# Altium PCB Power_vac.PcbDoc (part 4 of 5)
Units mm, origin at the board's own origin, x right, y up, seen from the top; angles counter-clockwise.
Board outline 180 x 212 mm, 4 copper layers (Top Layer, Int1 (GND), Int2 (PWR), Bottom Layer), stack 2.01 mm thick; 296 components, 149 nets, 798 pads, 522 vias.
Unrouted connection lines stored in the file: 1.
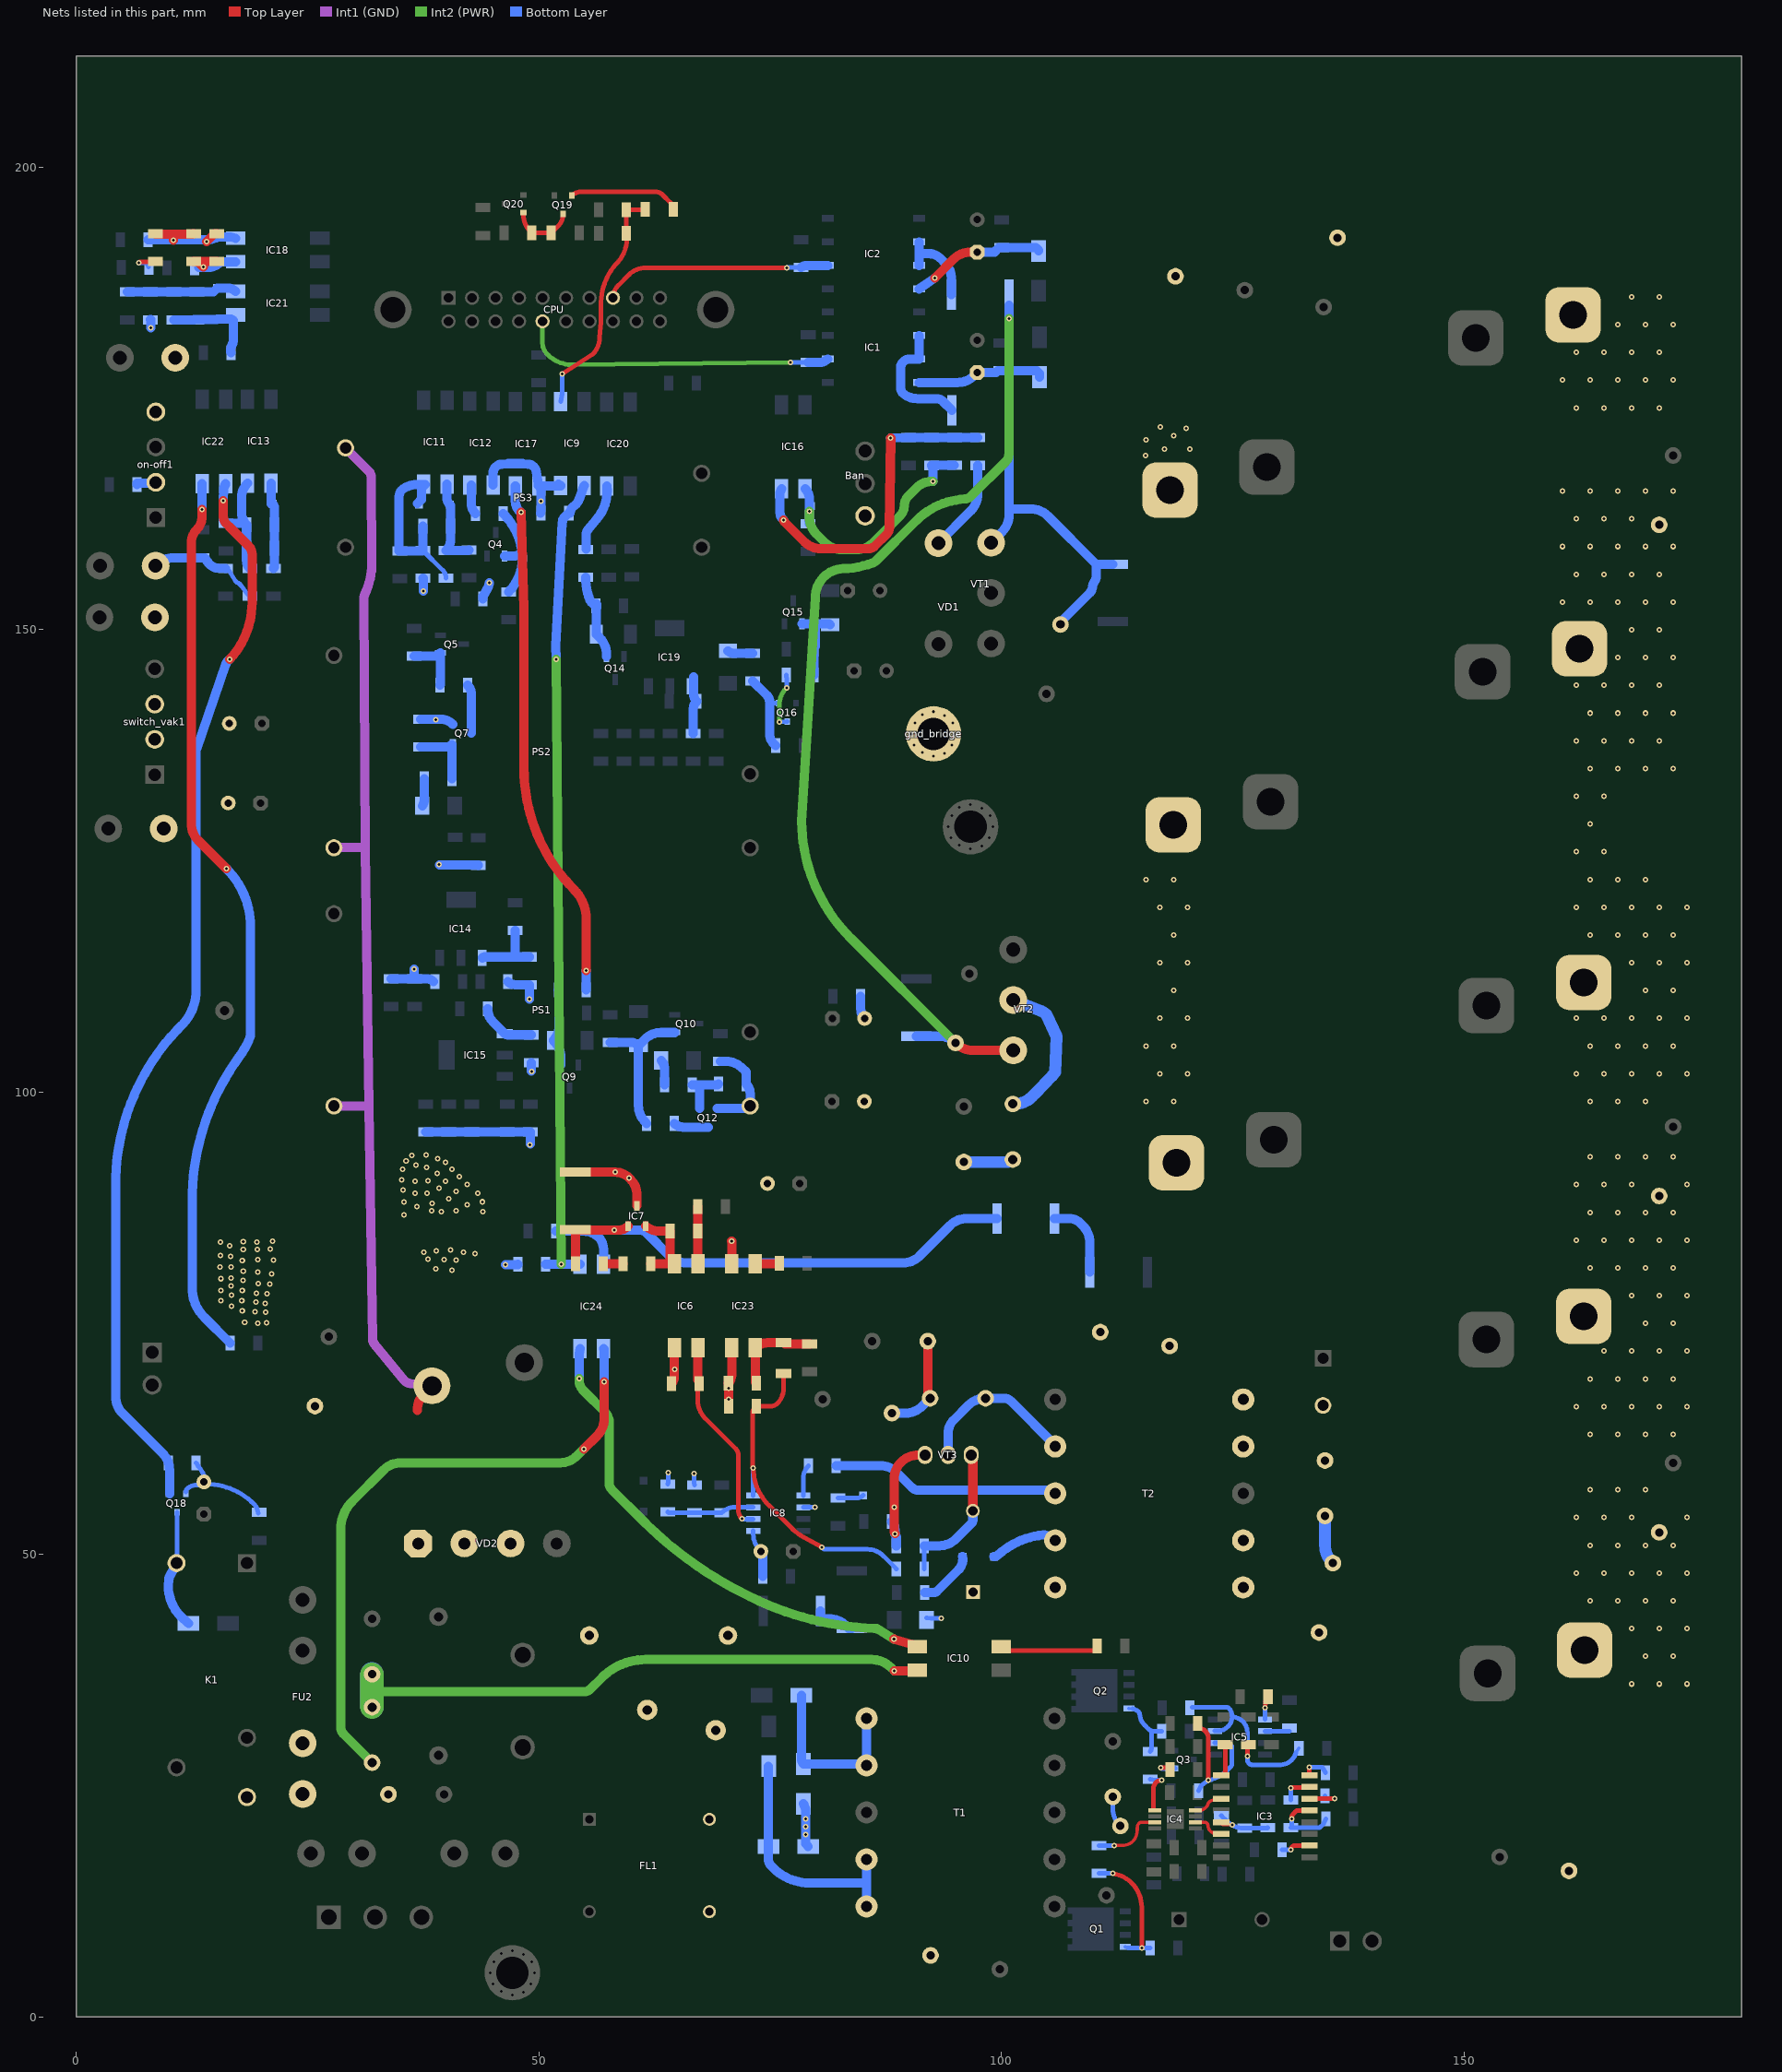
[diagram p5: the nets of this part, all layers, seen from the top]

## Via types
v1: diameter 0.6/0.6/0.6/0.6 (per signal layer), hole 0.3, Top Layer to Bottom Layer, tented both sides, 277 vias
v2: diameter 0.6, hole 0.3, Top Layer to Bottom Layer, tented both sides, 239 vias
v3: diameter 1.27, hole 0.711, Top Layer to Bottom Layer, 6 vias

## Nets (pads, with @x,y where several pads share a name; then routed paths per layer and width w, separated by ;. In a path a pad name is that pad's centre, name@x,y a point inside that pad or via, vN(x,y) a via of type N, cw(c..) or ccw(c..) an arc to the next point about the centre after c; other vN are vias at no path point) (continued)
GND_force: Ban.3 C1.2 C2.2 C3.2 C4.2 C5.2 C6.2 C7.2 C8.2 C9.2 C10.2 C11.2 C12.2 C13.2 C14.2 C15.1 C42.2 C52.1 C53.1 C54.2 C55.2 C56.1 C57.1 C58.1 C59.1 C60.1 C61.1 C62.1 C63.1 C64.1 C65.1 C66.1 C67.1 C68.2 C69.2 C79.1 C80.1 C81.1 C82.2 C83.1 C84.2 C90.2 C91.1 C93.1 C95.1 C97.1 C99.1 C101.1 D17.1 D22.1 D23.1 D24.1 gnd_bridge.1 IC7.3 IC9.2 IC12.3 IC17.3 IC23.2 on-off1.2 on-off1.4 PS1.3 Q7.2 Q12.2 Q18.2 R41.1 R54.1 R57.1 R61.1 R71.1 R87.1 R98.2 switch_vak1.2 switch_vak1.3 T2.6 T2.7 VD1.1 | length 117.7
  Top Layer w0.5: v2(6.75,189.675) cw(c6.931,189.494) 6.931,189.75 C97.1@8.525,189.75
  Top Layer w1: R41.1@53.925,91.325 v2(58.241,91.325) cw(c58.241,89.191) v2(59.75,90.7) 59.856,90.594 cw(c58.06,88.798) 60.6,88.798 IC7.3@60.6,87.7 ; v2(70.825,83.85) 70.83,83.845 IC23.2@70.83,81.425 ; gnd_bridge.1@92.65,138.725 gnd_bridge.1@92.947,138.428 ; C7.2@117.075,129.554 C7.2@118.575,128.875
  Bottom Layer w0.5: v2(6.75,189.675) 7.575,189.675 C79.1@7.8,189.225 ; Q18.2@11.825,56.752 cw(c12.325,56.75) 12.029,57.153 cw(c13.057,55.747) 13.057,57.489 13.72,57.489 ccw(c13.72,57.989) 13.927,57.534 13.95,57.489 ccw(c10.963,57.488) 13.175,59.495 R87.1@12.925,59.9 ; C84.2@13.775,57.825 14.011,57.589 cw(c14.011,50.286) 19.169,55.456 cw(c18.089,54.364) 19.569,54.775 C83.1@19.624,54.429 ; C81.1@16.1,156.6 16.507,156.35 17.149,155.291 17.15,155.289 ccw(c17.577,155.55) 17.364,155.097 cw(c16.9,154.1) 17.788,154.749 18.444,153.852 C91.1@18.744,153.602
  Bottom Layer w1: C80.1@6.525,165.7 6.525,165.812 8.462,165.812 on-off1.2@8.575,165.925 ; C99.1@8,183.525 8.05,183.525 v2(8.05,182.625) ; D17.1@8.55,156.9 8.681,157.031 cw(c10.477,155.235) 10.477,157.775 C82.2@13.575,157.775 13.873,157.775 13.875,157.775 14.152,157.373 cw(c13.328,156.806) 14.189,157.315 ccw(c15.352,158) 15.267,156.653 C81.1@16.1,156.6 ; C60.1@34.025,112.25 C59.1@36.525,112.25 ; v2@36.475,113.299 cw(c35.476,113.25) 36.476,113.25 36.476,112.25 C59.1@36.525,112.25 ; R54.1@37.175,140.3 39.372,140.3 cw(c39.372,138.422) Q7.2@40.7,139.75 ; C95.1@37.45,155.547 37.5,155.547 v2(37.5,154.175) ; C63.1@37.75,95.675 C64.1@40.25,95.675 C65.1@42.751,95.675 C66.1@46.55,95.675 C67.1@49.05,95.675 v2@49.05,94.361 ; C58.1@38.6,111.925 ccw(c37.815,111.14) 37.815,112.25 C59.1@36.525,112.25 ; v2@39.235,124.55 C53.1@40.95,124.55 43.329,124.55 cw(c43.329,124.379) C56.1@43.45,124.5 ; C52.1@43.95,153.3 43.95,153.6 44.423,154.431 ccw(c43.25,155.099) 44.566,154.797 44.584,154.877 cw(c45.9,154.575) v2(44.637,155.052) ; IC12.3@45.035,165.625 45.035,166.175 45.035,166.9 cw(c46.035,166.9) 45.961,167.897 46.615,167.946 cw(c46.716,166.6) 46.716,167.95 48.166,167.95 cw(c48.166,166.6) 48.289,167.944 48.819,167.896 cw(c48.728,166.9) 49.717,167.046 49.857,166.1 IC17.3@49.936,165.567 ; v2(46.375,81.3) 47.604,81.3 ccw(c47.604,81.471) C15.1@47.725,81.35 ; C57.1@46.626,111.925 ccw(c47.41,112.71) 47.41,111.6 R57.1@48.95,111.6 v2(48.95,110.05) ; v2@49.175,102.26 R61.1@49.175,103.175 ; IC17.3@49.981,165.55 cw(c49.39,164.96) 50.225,164.96 v2(50.225,163.9) 50.225,162.9 50.18,162.607 R98.2@50.175,162.577 ; IC17.3@50.156,165.55 IC9.2@52.345,165.55 ; IC9.2@52.116,165.742 IC9.2@52.341,165.575 ; Q12.2@69.25,98.2 72.161,98.2 ccw(c72.161,99.139) PS1.3@72.825,98.475 72.825,99.824 ccw(c71.374,99.824) R71.1@72.4,100.85 72.4,102.115 ccw(c72.315,102.115) 72.375,102.175 71.994,102.556 ccw(c70.198,100.76) 70.198,103.3 C62.1@69.6,103.3 ; C61.1@84.775,110.325 84.775,108.976 ccw(c86.226,108.976) C68.2@85.2,107.95 ; VD1.1@93.175,159.35 96.681,162.856 ccw(c94.885,164.652) 97.425,164.652 C101.1@97.425,167.75
  other v1: 168.125,35.975 171.125,35.975 174.125,35.975 169.625,38.975 172.625,38.975 168.125,41.975 171.125,41.975 174.125,41.975 163.625,44.975 166.625,44.975 169.625,44.975 172.625,44.975 162.125,47.975 165.125,47.975 168.125,47.975 171.125,47.975 174.125,47.975 163.625,50.975 166.625,50.975 169.625,50.975 172.625,50.975 162.125,53.975 165.125,53.975 168.125,53.975 174.125,53.975 163.625,56.975 166.625,56.975 169.625,56.975 163.625,62.975 166.625,62.975 169.625,62.975 172.625,62.975 162.125,65.975 165.125,65.975 168.125,65.975 171.125,65.975 174.125,65.975 163.625,68.975 166.625,68.975 169.625,68.975 172.625,68.975 165.125,71.975 168.125,71.975 171.125,71.975 174.125,71.975 169.625,74.975 172.625,74.975 168.125,77.975 171.125,77.975 174.125,77.975 163.625,80.975 166.625,80.975 169.625,80.975 172.625,80.975 162.125,83.975 165.125,83.975 168.125,83.975 171.125,83.975 174.125,83.975 163.625,86.975 166.625,86.975 169.625,86.975 172.625,86.975 162.125,89.975 165.125,89.975 168.125,89.975 174.125,89.975 163.625,92.975 166.625,92.975 169.625,92.975 172.625,92.975 115.625,98.975 118.625,98.975 163.625,98.975 166.625,98.975 169.625,98.975 117.125,101.975 120.125,101.975 162.125,101.975 165.125,101.975 168.125,101.975 171.125,101.975 174.125,101.975 115.625,104.975 118.625,104.975 163.625,104.975 166.625,104.975 169.625,104.975 172.625,104.975 117.125,107.975 120.125,107.975 162.125,107.975 165.125,107.975 168.125,107.975 171.125,107.975 174.125,107.975 118.625,110.975 169.625,110.975 172.625,110.975 117.125,113.975 120.125,113.975 168.125,113.975 171.125,113.975 174.125,113.975 118.625,116.975 163.625,116.975 166.625,116.975 169.625,116.975 172.625,116.975 117.125,119.975 120.125,119.975 162.125,119.975 165.125,119.975 168.125,119.975 171.125,119.975 174.125,119.975 115.625,122.975 118.625,122.975 163.625,122.975 166.625,122.975 169.625,122.975 162.125,125.975 165.125,125.975 163.625,128.975 162.125,131.975 165.125,131.975 163.625,134.975 166.625,134.975 169.625,134.975 172.625,134.975 162.125,137.975 165.125,137.975 168.125,137.975 171.125,137.975 163.625,140.975 166.625,140.975 169.625,140.975 172.625,140.975 162.125,143.975 165.125,143.975 168.125,143.975 171.125,143.975 166.625,146.975 169.625,146.975 172.625,146.975 168.125,149.975 171.125,149.975 160.625,152.975 163.625,152.975 166.625,152.975 169.625,152.975 172.625,152.975 162.125,155.975 165.125,155.975 168.125,155.975 171.125,155.975 160.625,158.975 163.625,158.975 166.625,158.975 169.625,158.975 172.625,158.975 162.125,161.975 165.125,161.975 168.125,161.975 160.625,164.975 163.625,164.975 166.625,164.975 169.625,164.975 172.625,164.975 118.625,170.975 162.125,173.975 165.125,173.975 168.125,173.975 171.125,173.975 160.625,176.975 163.625,176.975 166.625,176.975 169.625,176.975 172.625,176.975 162.125,179.975 165.125,179.975 168.125,179.975 171.125,179.975 166.625,182.975 169.625,182.975 172.625,182.975 168.125,185.975 171.125,185.975
  other v2: 19.575,75 20.55,75.025 18.175,75.075 20.45,76.175 19.3,76.25 17.925,76.325 16.775,76.85 20.4,77.15 19.375,77.275 15.625,77.425 17.875,77.425 16.775,78.05 20.6,78.2 19.45,78.25 15.625,78.525 17.925,78.525 16.7,79.025 20.9,79.225 19.625,79.275 18,79.625 15.625,79.8 16.725,79.875 21.1,80.325 19.575,80.5 18.025,80.625 40.6,80.7 38.825,80.85 15.525,81.075 16.7,81.075 17.925,81.775 21.3,81.8 41.05,81.8 19.6,81.85 39.725,81.85 38,81.9 16.65,82.225 15.575,82.325 43.075,82.5 37.55,82.675 41.85,82.675 38.875,82.8 40.425,82.925 18.025,82.975 19.525,82.975 20.925,83 16.575,83.35 15.55,83.75 19.475,83.775 18.025,83.825 21.175,83.85 35.4,86.7 39.425,87.056 43.925,87.075 38.381,87.147 41.049,87.15 36.775,87.625 42.25,87.825 38.45,87.975 35.4,88.1 43.875,88.125 40.25,88.45 36.575,89.025 37.875,89.025 43.4,89.025 41.025,89.25 35.325,89.375 39.2,89.575 42.25,89.975 36.6,90.35 39.9,90.35 37.975,90.375 35.175,90.5 41.4,90.85 39,91.175 40.575,91.625 35.275,91.65 37.825,91.825 36.696,92.079 39.875,92.4 35.625,92.525 39.05,92.8 36.25,93.15 37.8,93.175 49.025,94.3 49.2,102.2 36.475,113.3 39.175,124.575 38.825,140.275 115.55,168.8 117.625,169.5 120.375,169.5 115.625,170.525 119.975,171.775 117.175,171.9
GND_N: C43.2 C44.2 C46.1 C47.2 C50.2 C51.2 C88.2 C89.2 C90.1 C92.2 D6.2 D7.2 IC6.3 IC8.1 IC8.6 IC23.3 PS1.2 PS2.2 PS3.2 R40.1 R42.1 T2.5 VD2.1 Z1.2 | length 144.2
  Top Layer w0.5: IC6.3@64.155,72.8 IC6.3@64.63,72.325 ; IC23.3@70.355,72.65 IC23.3@70.83,72.325
  Top Layer w1: 36.825,65.573 cw(c39.365,65.573) 37.569,67.369 C50.2@38.425,68.225 ccw(c37.339,67.139) C50.2@37.339,68.675 ; C44.2@64.325,68.475 ccw(c63.589,69.211) 64.63,69.211 IC6.3@64.63,72.325 ; C89.2@70.5,66 70.5,68.44 ccw(c70.415,68.44) C88.2@70.475,68.5 ccw(c69.618,69.357) 70.83,69.357 IC23.3@70.83,72.325
  Int1 (GND) w1: PS1.2@27.825,98.475 31.327,98.475 cw(c31.327,98.065) 31.617,98.355 ; PS2.2@27.825,126.4 cw(c27.894,126.331) 27.894,126.429 31.2,126.429 31.05,153.363 31.05,153.365 cw(c32.05,153.368) 31.143,153.79 ccw(c23.158,157.524) 31.745,155.529 ; PS3.2@29.075,169.65 31.586,167.137 31.587,167.136 cw(c30.879,166.43) 31.879,166.436 31.93,157.19 31.93,157.187 cw(c24.782,157.147) 31.745,155.529 ; 31.198,126.139 31.615,98.479 31.617,98.355 ; C50.2@38.425,68.225 36.079,68.457 cw(c36.18,69.452) 35.408,68.816 32.22,72.704 cw(c32.994,73.337) 31.994,73.319 31.994,73.322 31.617,98.355
  Bottom Layer w0.5: C47.2@63.9,57.575 63.95,57.825 v2(63.95,58.85) ; v2(66.775,58.725) 66.775,57.75 R40.1@66.8,57.5 ; IC8.1@73.163,52.545 73.163,52.189 ccw(c75.703,52.189) 73.907,50.393 C43.2@73.975,50.325 ; IC8.6@78.587,55.085 v2(79.814,55.085) ccw(c79.814,55.136) v2@79.85,55.1 ; Z1.2@91.875,43.125 91.921,43.121 92.41,43.075 v2(93.475,43.075)
  Bottom Layer w1: C46.1@74.175,47.625 C43.2@74.175,49.842 ; D7.2@78.6,23.025 78.85,22.35 v2(78.85,21.375) v2(78.85,20.525) v2(78.85,19.675) 78.85,18.7 D6.2@79.1,18.4
  other v2: 70.525,66.775 70.525,67.95 64.675,70
NetC15_2: C15.2 IC9.1 IC24.3 R98.1 | length 88.7
  Int2 (PWR) w1: v2(51.85,146.8) v2(52.425,81.35)
  Bottom Layer w1: C15.2@50.725,81.35 v2(52.425,81.35) 54.205,81.35 IC24.3@54.43,81.35 ; v2(51.85,146.8) 51.825,148.233 cw(c52.825,148.25) 51.826,148.299 52.509,161.56 cw(c53.507,161.508) 52.837,162.25 R98.1@53.225,162.6 ; R98.1@53.352,162.6 53.352,162.603 cw(c54.35,162.549) 53.741,163.342 53.888,163.454 ccw(c53.066,164.525) 54.346,164.098 54.656,165.025 IC9.1@54.881,165.575
NetC17_1: C17.1 C18.2 D2.1 IC1.8 | length 13.9
  Bottom Layer w1: IC1.8@91.1,176.715 95.238,176.715 ccw(c95.238,179.255) 97.034,177.459 C17.1@97.375,177.8 99.4,177.8 99.6,178 103.4,178 103.425,177.975 103.8,177.975 104.1,177.675 D2.1@104.1,177.3
NetC19_2: C19.2 R1.1 R3.2 VT1.1 | length 35.5
  Bottom Layer w1: VT1.1@98.875,159.4 100.081,160.606 ccw(c98.285,162.402) 100.825,162.402 100.825,163.05 ; R1.1@100.825,172.7 100.825,163.05 ; C19.2@106.375,150.55 cw(c107.359,150.369) 106.651,151.076 109.534,153.959 ccw(c108.829,154.668) 109.823,154.564 cw(c111.22,154.421) 110.057,155.208 ccw(c109.227,155.765) 110.227,155.763 110.227,157.05 ; R3.2@112.05,157.05 110.227,157.05 ; 100.825,163.05 103.175,163.05 cw(c103.175,160.51) 104.97,162.307 cw(c103.175,160.51) 104.971,162.306 110.227,157.05
NetC20_1: C20.1 C21.2 D4.1 IC2.8 | length 14.7
  Top Layer w1: v2(92.775,188.025) 94.831,190.081 cw(c96.627,188.285) 96.627,190.825 C20.1@97.375,190.825
  Bottom Layer w1: IC2.8@91.1,186.84 v2(92.775,188.025) ; C20.1@97.375,190.825 99.25,190.825 99.725,191.3 C21.2@100.025,191.3 103.725,191.3 104.025,191 D4.1@104.025,190.95
NetC22_2: C22.2 R5.1 R7.2 VT2.1 | length 108.8
  Top Layer w1: C22.2@95.025,105.3 95.081,105.244 ccw(c96.877,107.04) 96.877,104.5 VT2.1@101.275,104.5
  Int2 (PWR) w1: 83.69,116.635 cw(c96.497,129.447) 78.383,129.189 cw(c96.497,129.447) 78.383,129.192 cw(c79.383,129.203) 78.383,129.203 cw(c79.383,129.203) 78.385,129.263 79.886,153.408 79.886,153.411 ccw(c78.888,153.47) 79.888,153.484 cw(c82.942,153.531) 82.847,156.585 ccw(c82.549,166.845) 82.849,156.585 ccw(c82.549,166.845) 86.075,157.205 ccw(c85.729,158.143) 86.329,157.343 ccw(c85.729,158.143) 86.434,157.434 90.781,161.781 cw(c96.455,156.091) 96.03,164.116 ccw(c95.975,165.114) 96.68,164.405 100.48,168.205 ccw(c99.709,168.977) 100.484,168.209 ccw(c99.709,168.977) 100.8,168.977 v2(100.8,183.65) ; 83.69,116.635 C22.2@95.025,105.3
  Bottom Layer w1: R7.2@90.8,106.025 93.275,106.025 cw(c93.275,103.55) C22.2@95.025,105.3 ; v2(100.8,183.65) R5.1@100.8,185.075
NetC28_2: C28.2 IC3.5 R15.2 | length 7.7
  Top Layer w0.5: v2(131.4,21.375) 131.389,21.533 cw(c131.888,21.565) 131.561,21.942 ccw(c131.067,22.517) 131.695,22.093 cw(c132.107,21.81) 132.106,22.31 IC3.5@133.3,22.31
  Bottom Layer w0.5: v2(131.4,21.375) 131.4,20.522 R15.2@131.301,20.423 133.605,20.423 ccw(c133.603,20.923) 133.618,20.423 133.68,20.425 cw(c133.694,19.925) 133.693,20.425 134.193,20.425 ccw(c134.193,20.925) 134.546,20.571 134.8,20.825 C28.2@135.05,21.375
NetC32_1: C32.1 IC3.8 | length 3.4
  Top Layer w0.5: v2(133.275,26.975) 133.275,26.27 IC3.8@133.3,26.12
  Bottom Layer w0.5: v2(133.275,26.975) 134.54,26.975 cw(c134.539,26.567) 134.574,26.973 cw(c134.543,26.625) 134.652,26.957 134.7,26.942 C32.1@135.025,26.376 C32.1@134.775,26.752
NetC33_1: C33.1 IC3.9 | length 3.5
  Top Layer w0.5: IC3.9@123.75,26.12 ccw(c123.75,26.545) 124.175,26.545 C33.1@124.175,29.425
NetC34_1: C34.1 C35.1 IC3.13 R14.1 | length 6.8
  Top Layer w0.35: IC3.13@123.75,21.04 ccw(c124.04,21.04) 124.04,20.75 v2(124.925,20.75)
  Bottom Layer w0.5: R14.1@123.775,21.725 124.356,21.144 ccw(c126.152,22.94) 126.152,20.4 C34.1@126.3,20.4 128.68,20.4 ccw(c128.68,20.571) C35.1@128.8,20.45
NetC38_1: C38.1 IC5.2 R21.2 | length 15.3
  Top Layer w0.5: C38.1@121.2,31.726 121.45,31.201 cw(c121.241,30.112) 122.35,30.112 v2(122.35,25.6)
  Bottom Layer w0.5: R21.2@121.325,24.45 121.575,25 v2(122.35,25.6) ; v2@122.362,25.548 ccw(c121.349,29.85) 124.478,26.728 124.754,27.004 ccw(c124.4,27.357) 124.9,27.357 124.9,29.086 ccw(c124.4,29.084) 124.607,29.539 cw(c124.996,30.395) 124.563,29.56 ccw(c124.335,29.115) 124.337,29.615 123.576,29.615 IC5.2@123.063,29.615
NetC39_1: C39.1 IC5.3 R20.1 R23.2 | length 21.3
  Top Layer w0.35: R23.2@126.575,29.1 R23.2@126.675,29.425
  Top Layer w0.5: v2(126.575,28.175) R23.2@126.575,29.1
  Bottom Layer w0.35: 129.942,27.225 cw(c129.942,26.875) 129.963,27.224 ; C39.1@131.825,28.548 C39.1@132.15,29.028
  Bottom Layer w0.5: R20.1@120.614,33.475 124.248,33.475 cw(c124.248,32.975) 124.661,33.257 cw(c123.4,32.4) 124.925,32.4 ; IC5.3@123.067,30.907 123.576,30.905 ccw(c123.327,32.468) 124.438,31.341 cw(c124.787,30.983) 124.455,31.356 ccw(c123.532,32.4) 124.925,32.4 ; 129.942,27.225 127.15,27.225 cw(c127.15,27.8) 126.575,27.8 v2(126.575,28.175) 126.575,30.75 ccw(c124.925,30.75) 124.925,32.4 ; 129.963,27.224 ccw(c130.076,29.037) C39.1@131.825,28.548
NetC40_2: C40.2 R25.2 | length 3.4
  Bottom Layer w0.5: R25.2@112.025,23.775 112.025,22.507 ccw(c114.565,22.507) 112.769,20.711 C40.2@112.852,20.628
NetC41_2: C41.2 D10.2 R26.1 | length 10.9
  Top Layer w1: R26.1@92.025,73.05 92.025,67.479 ccw(c92.879,67.479) D10.2@92.275,66.875
  Bottom Layer w1: C41.2@88.15,65.275 89.623,65.275 ccw(c89.623,67.815) 91.419,66.019 D10.2@92.275,66.875
NetC44_1: C44.1 IC6.4 IC8.2 | length 21.5
  Top Layer w0.5: C44.1@67.17,68.849 67.17,66.615 ccw(c69.841,66.611) 67.932,64.743 71.232,61.443 cw(c70.464,60.675) 71.233,61.441 cw(c70.464,60.675) 71.55,60.675 71.55,54.791 ccw(c72.916,54.791) v2(71.95,53.825)
  Top Layer w1: C44.1@67.17,68.849 IC6.4@67.17,72.325
  Bottom Layer w0.5: v2@71.95,53.815 v2@71.974,53.815 ; v2(71.95,53.825) ccw(c71.974,53.849) v2@71.974,53.815 ; IC8.2@73.163,53.815 v2@71.974,53.815
NetC45_1: C45.1 IC7.1 R36.1 R41.2 | length 54
  Top Layer w1: C45.1@53.95,81.4 53.95,85.065 58.599,85.065 ccw(c58.599,86.551) IC7.1@59.65,85.5
  Bottom Layer w1: v2(58.124,85.075) 60.886,85.075 cw(c60.886,84.075) 61.593,84.782 64.131,82.244 ccw(c65.927,84.04) 65.927,81.5 89.323,81.5 ccw(c89.323,84.04) 91.119,82.244 94.456,85.581 cw(c96.252,83.785) 96.252,86.325 R36.1@99.525,86.325
NetC45_2: C45.2 R34.1 | length 2.1
  Top Layer w1: C45.2@56.95,81.4 R34.1@59.075,81.4
NetC47_1: C47.1 IC8.3 R37.2 R40.2 | length 9.4
  Bottom Layer w0.5: C47.1@63.9,54.575 ccw(c64.081,54.756) 64.081,54.5 R40.2@66.8,54.5 R37.2@69.75,54.5 cw(c71.162,53.088) 71.162,55.085 IC8.3@73.163,55.085
NetC49_1: C49.1 FL1.4 R46.1
NetC49_2: C49.2 FL1.3 VD2.4
NetC86_1: C86.1 C91.2 D19.2 IC13.2 R59.2 R60.1 | length 11.9
  Bottom Layer w1: R59.2@16.152,161.5 17.973,161.5 cw(c17.973,160.931) R60.1@18.375,161.333 ; IC13.2@18.48,165.825 ccw(c20.001,164.304) 17.85,164.304 D19.2@17.85,163.625 17.85,162.601 ccw(c19.642,162.601) R60.1@18.375,161.333 ; C91.2@18.744,156.602 cw(c19.634,157.492) 18.375,157.492 C86.1@18.375,158.802 R60.1@18.375,161.333
NetC86_2: C86.2 D19.1 IC13.1 R56.1 R60.2 | length 9.3
  Bottom Layer w1: D19.1@21.02,163.572 IC13.1@21.02,165.825 ; D19.1@21.2,163.625 cw(c20.778,163.203) 21.375,163.203 R60.2@21.375,161.333 C86.2@21.375,158.802 21.375,156.825 cw(c21.059,156.825) R56.1@21.282,156.602
NetC87_2: C87.2 IC9.3 R88.2 R92.2 | length 25.5
  Top Layer w0.5: v2(52.5,177.65) 55.753,179.745 ccw(c55.483,180.165) 55.837,179.813 55.84,179.816 ccw(c54.01,181.577) 55.843,179.819 ccw(c54.01,181.577) 56.55,181.577 cw(c57.05,181.577) 56.551,181.614 56.671,183.243 ccw(c55.46,183.335) 56.675,183.335 56.675,185.047 56.675,185.049 cw(c63.756,185.051) 57.219,187.774 cw(c62.969,185.379) 58.571,189.789 ccw(c58.217,190.142) 58.595,189.815 ccw(c55.835,192.187) 58.596,189.816 ccw(c55.835,192.187) C87.2@59.415,192.844 ; C87.2@59.45,192.85 R88.2@59.45,195.4 61.379,195.4 ccw(c61.379,195.571) R92.2@61.5,195.45
  Bottom Layer w0.5: IC9.3@52.341,174.675 52.5,175.475 v2(52.5,177.65)
NetC88_1: C88.1 D15.2 IC23.4 R90.1 | length 9.9
  Top Layer w1: C88.1@73.475,68.5 cw(c73.728,68.754) 73.37,68.754 IC23.4@73.37,72.325 cw(c74.698,70.997) 74.698,72.875 D15.2@76.425,72.875 ccw(c76.727,73.177) 76.727,72.75 R90.1@79.25,72.75
NetC89_1: C89.1 D15.1 IC8.4 R91.1 | length 36.3
  Top Layer w0.5: D15.1@76.425,69.575 76.425,67.894 cw(c74.206,67.894) 75.775,66.325 cw(c74.99,67.11) 74.99,66 C89.1@73.5,66 73.246,65.746 ccw(c73.6,65.393) 73.1,65.393 73.1,59.602 cw(c72.6,59.605) 73.1,59.589 ccw(c73.599,59.572) 73.137,59.382 v2(73.163,59.319) ccw(c78.792,59.319) 74.812,55.338 77.383,52.767 77.385,52.765 ccw(c81.28,56.682) 78.638,51.831 v2(80.575,50.775)
  Bottom Layer w0.5: IC8.4@73.163,56.355 v2(73.163,59.319) ; v2(80.575,50.775) 80.594,50.749 ccw(c80.998,51.044) 80.996,50.544 85.501,50.544 cw(c85.498,48.11) 87.219,49.831 R91.1@88.625,48.425
NetC93_2: C93.2 R96.1 | length 5.3
  Bottom Layer w1.27: R96.1@134.975,54.15 134.975,50.952 ccw(c137.515,50.952) 135.719,49.156 C93.2@135.825,49.05
NetC94_1: C94.1 C95.2 D20.2 IC11.2 R53.1 R55.2 | length 20.8
  Bottom Layer w0.5: C95.2@37.45,158.547 39.615,156.382 cw(c38.806,155.573) C94.1@39.95,155.573
  Bottom Layer w1: R55.2@34.875,158.496 34.875,164.398 cw(c35.875,164.395) 35.333,165.235 cw(c36.827,162.914) 36.827,165.675 37.68,165.675 37.28,165.275 37.28,164.055 D20.2@36.85,163.625 ; R55.2@34.95,158.496 37.328,158.496 ccw(c37.328,158.669) C95.2@37.45,158.547 R53.1@37.45,161.2
NetC94_2: C94.2 D20.1 IC11.1 R48.1 R53.2 | length 9.9
  Bottom Layer w1: IC11.1@40.045,165.725 40.045,164.236 ccw(c41.086,164.236) D20.1@40.35,163.5 cw(c40.109,163.259) 40.45,163.259 R53.2@40.45,161.2 40.45,159.78 cw(c38.743,159.78) C94.2@39.95,158.573 42.389,158.573 ccw(c42.389,158.66) R48.1@42.45,158.599
NetC96_1: C96.1 C97.2 D16.2 IC18.2 R75.1 R76.2 | length 15.8
  Top Layer w1: C97.2@8.525,192.75 10.497,192.75 ; v2(10.45,192.1) 10.45,192.637 cw(c10.61,192.637) 10.497,192.75 ; C96.1@12.65,192.825 cw(c12.469,193.006) 12.469,192.75 10.497,192.75 ; v2(14.05,191.95) 14.766,192.666 cw(c15.15,192.282) R75.1@15.15,192.825
  Bottom Layer w1: R76.2@7.75,192.175 14.361,192.175 ccw(c14.361,193.175) 14.711,192.238 15.091,192.381 cw(c15.441,191.444) 15.441,192.444 16.65,192.444 IC18.2@17.2,192.32
NetC96_2: C96.2 D16.1 IC18.1 R72.1 R75.2 | length 7.9
  Top Layer w1: v2(13.7,189.2) 13.376,189.524 ccw(c12.65,188.799) C96.2@12.65,189.825 R75.2@15.15,189.825
  Bottom Layer w1: R72.1@13.2,189.175 13.7,189.175 14.28,189.175 ccw(c14.28,190.786) 15.308,189.545 cw(c15.943,188.773) 15.941,189.773 IC18.1@17.193,189.773
NetC98_1: C98.1 C99.2 D18.2 IC21.2 R84.1 R85.2 | length 12
  Bottom Layer w0.5: R85.2@5.475,186.5 R85.2@5.487,186.512 ; C99.2@7.987,186.512 8,186.525 C99.2@8.012,186.512 ; C98.1@10.487,186.512 C98.1@10.5,186.5 C98.1@10.505,186.505
  Bottom Layer w1: R85.2@5.487,186.512 C99.2@7.987,186.512 ; C99.2@8.012,186.512 C98.1@10.487,186.512 ; C98.1@10.505,186.505 R84.1@13.02,186.505 ; R84.1@13.025,186.511 14.786,186.511 D18.2@15.2,186.925 16.343,186.925 cw(c16.343,185.713) IC21.2@17.2,186.57
NetC98_2: C98.2 D18.1 IC21.1 R82.1 R84.2 | length 10.1
  Bottom Layer w1: C98.2@10.5,183.5 12.714,183.5 12.725,183.511 13.025,183.511 15.136,183.511 D18.1@15.2,183.575 16.602,183.575 cw(c16.602,183.08) 16.952,183.43 ccw(c17.95,183.369) 16.95,183.371 16.95,181.375 cw(c15.498,181.375) 16.776,180.686 ccw(c17.657,180.214) R82.1@16.7,179.925
NetC100_1: C100.1 C101.2 D21.2 IC16.2 R64.2 R67.1 | length 36.4
  Top Layer w1: v2(76.45,161.85) ccw(c76.752,161.85) 76.538,161.637 78.681,159.494 ccw(c80.477,161.29) 80.477,158.75 85.611,158.75 ccw(c85.611,159.75) 86.211,158.95 ccw(c85.611,159.75) 86.317,159.042 87.582,160.307 ccw(c86.875,161.015) 87.875,160.999 v2(88.025,170.7)
  Bottom Layer w1: IC16.2@76.23,165.225 76.025,164.675 D21.2@76.025,163.375 76.046,162.634 ccw(c77.045,162.663) 76.358,161.937 v2(76.45,161.85) ; v2(88.025,170.7) 89.625,170.75 R64.2@89.925,170.75 ; R64.2@89.901,170.75 R67.1@92.425,170.75 92.43,170.755 C100.1@94.925,170.755 97.12,170.755 97.125,170.75 C101.2@97.425,170.75
NetC100_2: C100.2 D21.1 IC16.1 R63.1 R67.2 | length 27.4
  Int2 (PWR) w1: v2(79.225,162.775) 79.225,162.152 ccw(c81.765,162.152) 79.969,160.356 80.931,159.394 ccw(c82.727,161.19) 82.727,158.65 84.323,158.65 ccw(c84.323,161.19) 86.119,159.394 89.051,162.326 ccw(c88.026,163.35) 89.475,163.35 cw(c91.044,163.35) 89.935,164.46 90.781,165.306 cw(c92.577,163.51) v2(92.577,166.05)
  Bottom Layer w1: IC16.1@78.77,165.225 cw(c77.672,164.127) 79.225,164.127 v2(79.225,162.775) R63.1@79.225,161.45 ; R67.2@92.425,167.75 cw(c91.577,167.219) 92.577,167.222 v2(92.577,166.05) ; R67.2@92.425,167.78 C100.2@94.899,167.78
NetD1_2: D1.2 K1.2 Q18.3 | length 13
  Bottom Layer w0.5: K1.2@10.875,49.05 Q18.3@10.875,54.525
  Bottom Layer w1: K1.2@10.875,49.05 10.872,49.05 cw(c9.974,49.489) 10.841,48.992 10.114,47.731 ccw(c10.982,47.234) 9.998,47.413 ccw(c14.624,46.582) 9.946,46.125 ccw(c14.624,46.582) 11.8,42.825 D1.2@12.1,42.525
NetD3_1: D3.1 R4.2 | length 5.4
  Bottom Layer w1.27: R4.2@95.925,92.425 100.561,92.425 ccw(c100.561,93.364) D3.1@101.225,92.7
NetD3_2: D3.2 VT2.2 | length 16.3
  Bottom Layer w1.27: D3.2@101.225,98.7 101.448,98.7 ccw(c101.448,101.24) 103.244,99.444 103.619,99.819 ccw(c102.721,100.717) 103.633,99.833 105.46,101.719 ccw(c104.548,102.603) 105.527,101.794 105.8,102.125 105.95,105.998 104.85,108.375 104.611,108.563 ccw(c103.825,107.565) 104.296,108.745 VT2.2@101.275,109.95
NetD5_2: D5.2 D6.1 T1.9 T1.10 | length 26.8
  Bottom Layer w1: D5.2@74.8,27.075 74.8,18.1 74.8,17.024 ccw(c75.8,17.026) 75.043,16.372 ccw(c79.225,20.003) 79.225,14.465 79.228,14.465 85.405,14.465 ; T1.10@85.405,11.925 85.405,14.465 ; T1.9@85.405,17.005 85.405,14.465
NetD7_1: D7.1 D8.2 T1.6 T1.7 | length 19.4
  Bottom Layer w1: D8.2@78.375,34.75 78.375,27.868 ccw(c79.143,27.868) D7.1@78.6,27.325 85.019,27.325 cw(c85.019,26.779) T1.7@85.405,27.165 T1.6@85.405,32.245
NetD9_2: D9.2 R96.2 T2.9 T2.10
NetD10_1: D10.1 T2.2 VT3.2 | length 18
  Bottom Layer w1: VT3.2@94.225,60.75 94.225,63.076 cw(c96.274,63.076) 94.825,64.525 96.431,66.131 cw(c98.227,64.335) 98.227,66.875 100.303,66.875 cw(c100.303,65.875) 101.01,66.582 T2.2@105.93,61.662
NetD11_1: D11.1 R31.2 | length 6.2
  Bottom Layer w0.5: 95.329,48.304 ccw(c94.16,49.473) 95.33,48.305
  Bottom Layer w1: R31.2@91.675,45.875 92.693,45.875 ccw(c92.693,46.375) 93.046,46.021 95.329,48.304 ; 95.33,48.305 ccw(c94.16,49.473) D11.1@95.791,49.744
NetD11_2: D11.2 T2.4 | length 7.2
  Bottom Layer w1: D11.2@99.175,49.75 ccw(c99.034,50.74) 99.7,49.994 cw(c105.261,43.789) 104.493,52.086 cw(c104.583,51.09) 104.937,52.025 T2.4@105.697,51.735
NetD12_1: D12.1 R35.2 | length 2.8
  Bottom Layer w0.5: R35.2@82.325,56.075 84.326,56.075 ccw(c84.326,57.099) D12.1@85.05,56.375
NetD12_2: D12.2 R38.2 R39.2 VT3.1 | length 14.9
  Top Layer w0.5: 89.125,59.95 89.181,60.006 ; VT3.1@91.056,60.75 VT3.1@91.725,60.75
  Top Layer w1: v2@88.5,52.25 cw(c88.741,52.491) 88.4,52.491 v2(88.4,55.075) 88.4,58.2 cw(c90.875,58.2) 89.125,59.95 cw(c91.056,58.019) VT3.1@91.056,60.75
  Bottom Layer w0.5: v2(88.4,55.075) D12.2@88.4,56.375
  Bottom Layer w1: R38.2@88.1,53.55 cw(c87.195,52.645) 88.475,52.645 v2(88.475,52.225) cw(c88.113,51.863) 88.625,51.863 R39.2@88.625,50.925
NetD13_1: D13.1 IC10.2 R45.2 | length 69.1
  Top Layer w1: v2(88.4,37.4) 90.325,37.4 IC10.2@90.875,37.48
  Int2 (PWR) w1: D13.1@31.95,33.475 31.95,35.033 cw(c32.419,34.15) 32.417,35.15 54.861,35.15 ccw(c54.861,36.15) 55.461,35.35 ccw(c54.861,36.15) 55.568,35.443 56.781,36.656 cw(c61.535,31.903) 61.535,38.625 85.947,38.625 cw(c85.946,35.657) 85.948,38.625 cw(c85.946,35.657) 88.042,37.758 v2(88.4,37.4)
  Int2 (PWR) w2.54: D13.1@31.95,33.475 31.95,35.033 R45.2@31.95,37.025
  Bottom Layer w2.54: D13.1@31.925,33.516 R45.2@31.925,37.066
NetD13_2: D13.2 IC24.1 R43.2 | length 68.8
  Top Layer w1: v2(54.85,61.4) 56.306,62.856 ccw(c54.51,64.652) 57.05,64.652 v2(57.05,68.675)
  Int2 (PWR) w1: D13.2@31.95,27.475 28.868,30.557 cw(c29.575,31.264) 28.575,31.264 28.575,52.743 cw(c32.822,52.741) 29.819,55.744 33.231,59.156 cw(c35.027,57.36) 35.027,59.9 52.298,59.9 ccw(c52.298,62.44) 54.094,60.644 v2(54.85,61.4)
  Bottom Layer w1: IC24.1@56.97,72.25 cw(c56.777,72.057) 57.05,72.057 v2(57.05,68.675)
NetFU2_1: FU2.1 K1.4
NetIC1_6: IC1.6 IC1.7 R1.2 | length 13.8
  Bottom Layer w1: IC1.6@91.1,181.795 IC1.7@91.1,179.255 90.075,179.255 ccw(c90.075,178.255) 89.075,178.255 89.075,176.227 89.075,176.224 ccw(c90.075,176.227) 89.539,175.383 ccw(c90.95,177.618) 90.95,174.975 92.962,174.975 cw(c92.961,173.975) 93.667,174.683 R1.2@94.625,173.725
NetIC2_6: IC2.6 IC2.7 R5.2 | length 9.3
  Bottom Layer w1: IC2.7@91.1,189.38 91.1,190.65 ; IC2.6@91.1,191.92 91.1,190.65 ; R5.2@94.6,186.225 94.6,187.873 ccw(c92.06,187.873) 93.856,189.669 93.375,190.15 ccw(c92.168,188.943) 92.168,190.65 91.1,190.65
NetIC3_2: IC3.2 R10.2 | length 3.2
  Top Layer w0.5: v2(131.275,18.05) cw(c131.725,18.05) 131.725,18.5 IC3.2@133.3,18.5
  Bottom Layer w0.5: R10.2@130.325,18.05 v2(131.275,18.05)
NetIC3_6: IC3.6 R17.2 | length 4
  Top Layer w0.5: IC3.6@133.3,23.58 136.025,23.58 v2(136.025,23.575)
  Bottom Layer w0.5: R17.2@134.975,23.875 ccw(c135.275,23.875) 135.275,23.575 v2(136.025,23.575)
NetIC3_7: IC3.7 R15.1 | length 3.4
  Top Layer w0.5: v2(131.275,24.75) 131.323,24.798 133.248,24.798 IC3.7@133.3,24.85
  Bottom Layer w0.5: v2(131.275,24.75) 131.275,23.748 R15.1@131.301,23.423
NetIC3_11: IC3.11 IC4.4 | length 3.3
  Top Layer w0.35: IC4.4@120.975,22.324 121.5,22.331 ccw(c121.383,23.316) 122.279,22.888 ccw(c121.383,23.316) 122.343,23.062 cw(c122.681,22.971) 122.477,23.255 cw(c123.09,22.392) 122.822,23.416 cw(c124.011,18.874) 123.05,23.47 IC3.11@123.747,23.562
NetIC3_14: IC3.14 IC4.2 | length 3.5
  Top Layer w0.35: IC4.2@120.975,21.024 121.96,21.024 cw(c121.959,20.674) 122.309,20.693 ccw(c123.28,20.743) 122.328,20.544 ccw(c123.28,20.743) 123.28,19.77 IC3.14@123.75,19.77
NetIC4_5: IC4.5 R12.1 | length 4.9
  Top Layer w0.5: IC4.5@116.425,22.45 116.425,24.678 cw(c117.333,24.678) v2(117.333,25.586)
  Bottom Layer w0.5: R12.1@116.075,25.674 116.625,25.586 v2(117.333,25.586)
NetIC4_7: IC4.7 R9.1 | length 7.6
  Top Layer w0.35: v2(112.175,18.5) 113.025,18.5 ccw(c113.025,20.15) 114.675,20.15 114.675,20.423 cw(c115.42,20.42) 114.834,20.88 cw(c115.42,20.42) 114.835,20.882 cw(c115.109,20.664) 115.109,21.014 116.05,21.014 IC4.7@116.575,21.024
  Bottom Layer w0.5: R9.1@110.525,18.5 v2(112.175,18.5)
NetIC5_5: IC5.5 R24.2 | length 2.5
  Top Layer w0.5: v2(128.487,33.425) 128.561,34.075 R24.2@128.811,34.625
  Bottom Layer w0.5: IC5.5@128.487,32.155 v2(128.487,33.425)
NetIC5_6: IC5.6 R22.2 | length 2.7
  Bottom Layer w0.5: IC5.6@128.487,30.885 R22.2@131.146,30.885
NetIC6_1: IC6.1 R30.2 R32.2 | length 6.2
  Top Layer w1: R30.2@67.15,87.6 R32.2@67.15,84.95 cw(c67.102,84.902) 67.17,84.902 IC6.1@67.17,81.425
NetIC6_2: IC6.2 IC7.2 R32.1 R34.2 | length 8.3
  Top Layer w1: IC7.2@61.55,85.5 ccw(c62.878,86.828) 62.878,84.95 R32.1@64.15,84.95 64.15,81.762 cw(c63.638,81.762) 64,81.4 R34.2@62.075,81.4
NetIC8_5: IC8.5 R29.1 | length 3.4
  Bottom Layer w0.5: IC8.5@78.587,56.355 78.587,58.276 cw(c80.424,58.276) R29.1@79.125,59.575
NetIC10_1: IC10.1 IC24.2 | length 54.6
  Top Layer w1: v2(88.375,40.825) 90.325,40.245 IC10.1@90.875,40.02
  Int2 (PWR) w1: v2(54.35,69) ccw(c55.33,68.8) 54.336,68.688 ccw(c56.032,68.882) 54.337,68.684 ccw(c56.032,68.882) 54.825,67.675 57.133,65.367 cw(c56.066,64.3) 57.575,64.3 57.575,57.701 ccw(c58.575,57.704) 57.866,56.999 61.248,53.617 ccw(c91.441,83.917) 74.804,44.51 ccw(c87.291,74.085) 86.245,41.999 cw(c86.212,41) 86.741,41.848 v2(88.375,40.825)
  Bottom Layer w1: v2(54.35,69) 54.35,71.7 IC24.2@54.43,72.25
NetIC10_4: IC10.4 R44.1 | length 10.8
  Top Layer w0.5: IC10.4@99.975,40.02 100.775,39.575 110.1,39.575 R44.1@110.35,40.075
NetIC12_4: IC12.4 R52.1 | length 3.2
  Bottom Layer w1: IC12.4@42.67,165.625 42.67,163.648 ccw(c44.223,163.648) R52.1@43.125,162.55
NetIC14_1: IC14.1 R57.2 R58.1 | length 8
  Bottom Layer w1: IC14.1@43.875,114.5 cw(c44.116,114.259) 44.116,114.6 47.25,114.6 ; R58.1@47.425,117.475 47.425,115.022 cw(c46.828,115.022) 47.25,114.6 ; R57.2@48.95,114.6 47.25,114.6
NetIC15_1: IC15.1 R61.2 R62.1 | length 6.3
  Bottom Layer w1: R62.1@44.45,108.975 ccw(c46.442,108.975) 45.033,107.567 IC15.1@46.3,106.3 ccw(c46.602,106.602) 46.602,106.175 R61.2@49.175,106.175
NetIC17_4: IC17.4 R70.1 | length 56.5
  Top Layer w1: v2(48.075,162.675) 48.375,152.269 cw(c47.375,152.24) 48.375,152.24 48.375,134.997 ccw(c66.958,134.997) 53.798,121.877 cw(c50.621,118.72) 55.1,118.725 cw(c50.621,118.72) 55.1,118.723 v2(55.1,113.125)
  Bottom Layer w1: IC17.4@47.441,165.55 47.441,163.862 ccw(c48.441,163.862) 47.489,163.554 47.588,163.249 ccw(c48.538,163.561) 47.856,162.831 ccw(c48.538,163.561) v2(48.075,162.675) ; R70.1@55.1,111.05 v2(55.1,113.125)
NetIC19_1: IC19.1 R73.2 R74.1 | length 6.3
  Bottom Layer w1: R73.2@66.676,138.75 66.676,141.437 cw(c67.676,141.437) 66.968,142.143 R74.1@67.05,142.225 cw(c67.895,143.07) 66.7,143.07 66.7,144.875
NetIC20_4: IC20.4 R81.1 | length 7.5
  Bottom Layer w1: R81.1@55.075,158.703 55.075,160.187 cw(c56.075,160.187) 55.302,160.821 56.17,161.88 56.172,161.882 cw(c56.944,161.246) 56.194,161.909 ccw(c52.733,164.983) 57.363,164.975 IC20.4@57.331,165.525
NetIC22_3: IC22.3 Q18.1 R87.2 | length 116.7
  Top Layer w1: v2(15.875,163.938) 15.877,162.186 ccw(c16.877,162.188) 16.167,161.483 16.734,160.916 18.62,159.03 cw(c17.763,158.173) 18.975,158.173 18.975,152.928 cw(c9.956,152.928) v2(16.55,146.775)
  Bottom Layer w0.5: 9.925,58.398 cw(c10.352,58.398) 10.05,58.7
  Bottom Layer w1: Q18.1@10.05,56.525 10.05,58.7 10.05,59.123 ccw(c7.51,59.123) 9.306,60.919 4.969,65.256 cw(c6.765,67.052) 4.225,67.052 4.225,89.969 4.225,89.972 cw(c28.617,89.972) 11.369,107.219 cw(c28.617,89.972) 11.37,107.22 ccw(c7.627,110.963) 12.92,110.963 12.92,110.966 12.92,136.774 cw(c13.92,136.774) 12.974,137.098 16.137,146.257 cw(c17.081,145.928) v2(16.55,146.775) ; v2(15.875,163.938) 15.895,165.25 IC22.3@16.12,165.8
NetIC22_4: IC22.4 R86.1 | length 98.3
  Top Layer w1: v2(13.575,163) 13.575,162.249 cw(c11.526,162.249) 12.975,160.8 ccw(c14.363,159.412) 12.4,159.412 12.4,129.002 ccw(c14.94,129.002) 13.144,127.206 v2(16.225,124.125)
  Bottom Layer w1: v2(13.575,163) 13.58,163.005 IC22.4@13.58,165.8 ; v2(16.225,124.125) cw(c10.008,117.908) 18.8,117.91 18.8,117.906 18.8,106.245 cw(c17.8,106.245) 18.743,105.912 cw(c12.428,108.154) 18.396,105.107 cw(c9.658,109.568) 17.589,103.792 ; R86.1@16.6,72.85 13.792,75.658 13.791,75.659 cw(c16.941,78.789) 12.5,78.789 12.5,78.793 12.5,88.217 cw(c38.848,88.227) 17.588,103.791
NetIC23_1: IC23.1 R89.2 | length 2.6
  Top Layer w1: IC23.1@73.37,81.425 75.94,81.425 ccw(c75.94,81.51) R89.2@76,81.45
NetIC24_4: IC24.4 R97.1 | length 7.9
  Bottom Layer w1: R97.1@51.825,84.95 54.82,84.95 cw(c54.82,82.645) 56.45,84.275 cw(c55.195,83.02) 56.97,83.02 IC24.4@56.97,81.35
NetQ1_4: Q1.4 R9.2 R11.2 | length 13.9
  Top Layer w0.5: v2(112.025,15.5) v2@112.033,15.501 ; v2@112.031,15.488 cw(c111.464,11.846) 115.15,11.846 v2(115.15,7.425)
  Bottom Layer w0.35: Q1.4@113.375,7.57 ccw(c113.665,7.86) Q1.4@113.665,7.45
  Bottom Layer w0.5: R9.2@110.525,15.5 v2(112.025,15.5) ; Q1.4@113.665,7.45 R11.2@116.075,7.45
NetQ2_4: Q2.4 R12.2 R18.2 | length 7.1
  Bottom Layer w0.35: Q2.4@113.775,33.345 Q2.4@114.2,33.293
  Bottom Layer w0.5: Q2.4@114.2,33.293 cw(c113.798,31.763) 114.793,32.993 cw(c114.573,32.721) 114.922,32.747 ccw(c116.845,32.882) 115.482,31.518 115.483,31.517 115.9,31.1 ccw(c116.444,31.644) 116.444,30.875 R18.2@117.325,30.875 ; R12.2@116.075,28.674 ccw(c115.773,28.976) 116.2,28.976 116.2,30.925
NetQ3_1: Q3.1 R19.2 | length 2.6
  Top Layer w0.5: v2(117.225,26.925) 117.95,26.925 R19.2@118.2,26.725
  Bottom Layer w0.5: v2(117.225,26.925) ccw(c117.3,26.925) 117.3,26.85 Q3.1@118.75,26.85
NetQ4_1: Q4.1 R47.2 R52.2 | length 11.4
  Bottom Layer w1: R52.2@46.125,162.55 cw(c41.061,157.486) 48.177,158.296 ; Q4.1@46.275,157.975 47.401,157.975 ccw(c47.401,159.072) 48.177,158.296 ; R47.2@46.7,154.075 ccw(c43.057,157.718) 48.177,158.294 ccw(c43.057,157.718) 48.177,158.296
NetQ5_1: Q5.1 R50.1 R51.2 | length 6.4
  Bottom Layer w1: R50.1@36.5,147.125 38.48,147.125 ccw(c38.48,148.32) Q5.1@39.325,147.475 39.325,144.121 cw(c39.154,144.121) R51.2@39.275,144
NetQ7_1: Q7.1 R49.1 R54.2 | length 7.2
  Bottom Layer w1: R54.2@37.175,137.3 39.976,137.3 ccw(c39.976,138.148) 40.575,137.548 R49.1@40.575,133.85
NetQ7_3: Q7.3 R51.1 | length 5.3
  Bottom Layer w1: R51.1@42.275,144 cw(c41.249,142.974) 42.7,142.974 Q7.3@42.7,138.8
NetQ9_1: Q9.1 R65.2 R70.2 Z2.2 | length 8.6
  Bottom Layer w1: R70.2@52.1,111.05 cw(c51.979,110.929) 52.15,110.929 R65.2@52.15,108.55 52.15,107.06 cw(c50.05,107.06) Z2.2@51.535,105.575 51.606,105.504 cw(c49.81,103.708) 52.35,103.708 Q9.1@52.35,102.9
NetQ10_1: Q10.1 R68.1 R69.2 Z3.2 | length 16.2
  Bottom Layer w1: R68.1@57.7,105.35 59.929,105.35 cw(c59.929,104.189) Z3.2@60.75,105.01 ; R69.2@61.625,96.6 61.494,96.731 cw(c63.29,98.527) 60.75,98.527 Z3.2@60.75,105.01 ; Q10.1@64.675,106.425 63.217,106.425 ccw(c63.217,103.885) 61.421,105.681 Z3.2@60.75,105.01
NetQ12_1: Q12.1 R66.1 R71.2 | length 5.5
  Bottom Layer w1: R66.1@66.575,100.775 67.225,100.775 ; Q12.1@67.35,98.2 67.35,100.473 ccw(c66.923,100.473) 67.225,100.775 ; R71.2@69.4,100.85 cw(c69.219,101.031) 69.219,100.775 67.225,100.775
NetQ12_3: Q12.3 R69.1 | length 3.8
  Bottom Layer w1: R69.1@64.625,96.6 ccw(c65.591,97.566) 65.591,96.2 Q12.3@68.3,96.2
NetQ14_1: Q14.1 R77.2 R81.2 Z4.2 | length 9.6
  Bottom Layer w1: R81.2@55.024,155.65 ccw(c61.411,155.65) 55.519,153.185 ccw(c56.441,153.574) 55.906,152.729 R77.2@56.15,152.575 ; R77.2@56.193,152.837 cw(c55.24,152.534) 56.185,152.206 Z4.2@56.185,149.5 56.556,149.129 cw(c54.76,147.333) 57.3,147.333 Q14.1@57.3,147.075
NetQ15_1: Q15.1 R79.1 R80.2 Z5.2 | length 8.6
  Bottom Layer w1: Q15.1@78.45,150.625 79.854,150.625 ; R80.2@79.725,145.1 R79.1@79.725,147.875 cw(c80.165,147.875) 79.854,148.186 79.854,150.625 ; Z5.2@81.475,150.535 ccw(c81.258,150.318) 81.258,150.625 79.854,150.625
NetQ16_1: Q16.1 R78.2 R83.1 | length 8.9
  Bottom Layer w0.5: 74.925,142.187 75.062,142.05 Q16.1@75.9,142.05
  Bottom Layer w1: R83.1@73.1,144.425 74.632,142.893 cw(c73.925,142.186) 74.925,142.187 74.925,138.758 ccw(c76.537,138.758) 75.575,137.464 R78.2@75.582,137.459
NetQ16_3: Q16.3 R80.1 | length 6.2
  Int2 (PWR) w0.5: v2(75.975,140) 75.975,141.848 cw(c78.515,141.848) 76.719,143.644 v2(76.775,143.7)
  Bottom Layer w0.5: v2(75.975,140) Q16.3@76.85,140.05 ; R80.1@76.725,145.1 76.775,144.55 v2(76.775,143.7)
NetQ19_1: Q19.1 R92.1 | length 12
  Top Layer w0.5: Q19.1@53.551,196.924 53.6,196.974 cw(c54.537,195.993) 54.537,197.35 62.526,197.35 cw(c62.525,196.143) 63.376,196.999 cw(c63.023,196.645) 63.377,196.998 64.2,196.175 cw(c63.474,195.45) 64.34,196 R92.1@64.5,195.45
NetQ19_3: Q19.3 Q20.1 R93.1 R95.2 | length 7
  Top Layer w0.5: Q20.1@48.3,195.075 48.3,194.877 ccw(c50.84,194.877) 49.044,193.081 R93.1@49.225,192.9 R95.2@51.325,192.9 52.07,193.645 ccw(c50.789,194.925) Q19.3@52.6,194.925
NetR27_2: R27.2 R28.1 | length 4.6
  Bottom Layer w1: R27.2@80.425,43.875 80.425,43.05 81.296,43.05 cw(c81.295,40.327) 83.443,42 R28.1@83.825,42
NetR29_2: R29.2 T2.3 | length 24.7
  Bottom Layer w1: R29.2@82.125,59.575 86.912,59.575 cw(c86.912,57.035) 88.708,58.831 90.296,57.243 90.298,57.242 ccw(c91.004,57.95) 91.004,56.95 104.959,56.95 cw(c104.962,55.805) 105.782,56.603 ccw(c106.497,57.303) T2.3@105.805,56.582
NetR33_1: R33.1 R36.2 | length 8.6
  Bottom Layer w1: R36.2@105.725,86.325 107.293,86.325 cw(c107.293,84.618) 108.5,85.825 108.806,85.519 cw(c107.01,83.723) 109.55,83.723 R33.1@109.55,80.5
NetR39_1: R39.1 R42.2 R91.2 VT3.3 | length 16
  Top Layer w1: VT3.3@96.725,60.75 cw(c95.9,60.185) 96.9,60.187 R42.2@96.9,54.7
  Bottom Layer w0.5: R91.2@91.625,48.425 R39.1@91.625,50.925
  Bottom Layer w1: R39.1@91.625,50.925 93.273,50.925 ccw(c93.273,53.465) 95.069,51.669 96.754,53.354 ccw(c96.4,53.707) 96.9,53.707 R42.2@96.9,54.7
NetR46_2: R46.2 VD2.2
NetR49_2: R49.2 Z8.2 | length 3
  Bottom Layer w1: Z8.2@37.375,130.95 ccw(c36.892,131.433) 37.575,131.433 R49.2@37.575,133.85
NetR66_2: R66.2 Z7.2 | length 2.7
  Bottom Layer w1: Z7.2@63.2,103.4 cw(c62.295,102.495) 63.575,102.495 R66.2@63.575,100.775
NetR83_2: R83.2 Z6.2 | length 2.7
  Bottom Layer w1: Z6.2@70.425,147.7 ccw(c71.089,148.364) 71.089,147.425 R83.2@73.1,147.425
On_off_hard_rele_24v_test: CPU.15 IC2.2 R6.2 | length 24.9
  Top Layer w0.5: CPU.15@58,185.875 cw(c59.871,185.875) 58.548,187.198 59.731,188.381 cw(c61.527,186.585) 61.527,189.125 v2(76.8,189.125)
  Bottom Layer w0.5: v2(76.8,189.125) cw(c76.921,189.004) 76.921,189.175 R6.2@78.35,189.175
  Bottom Layer w1: R6.2@78.35,189.175 cw(c78.957,188.38) 78.954,189.38 IC2.2@81.2,189.38
On_off_hard_rele_310v: CPU.10 IC1.2 R2.2 | length 34.4
  Int2 (PWR) w0.5: CPU.10@50.38,183.335 50.38,180.959 50.38,180.957 ccw(c52.004,180.957) 50.985,179.693 cw(c50.67,179.305) 51.02,179.662 ; v2(77.175,178.9) 53.476,178.655 cw(c53.472,182.144) 51.021,179.661 ; 51.02,179.662 51.021,179.661
  Bottom Layer w0.5: v2(77.175,178.9) R2.2@79.1,178.9
  Bottom Layer w1: R2.2@79.1,178.9 80.343,178.9 ccw(c80.343,180.112) IC1.2@81.2,179.255